# Altium PCB Electrode_Board_v3.1.PcbDoc
Units mm, origin at the board's own origin, x right, y up, seen from the top; angles counter-clockwise.
Board outline 12.97 x 31.97 mm, 2 copper layers (Top Layer, Bottom Layer), stack 0.864 mm thick; 2 components, 3 nets, 8 pads, 18 vias.
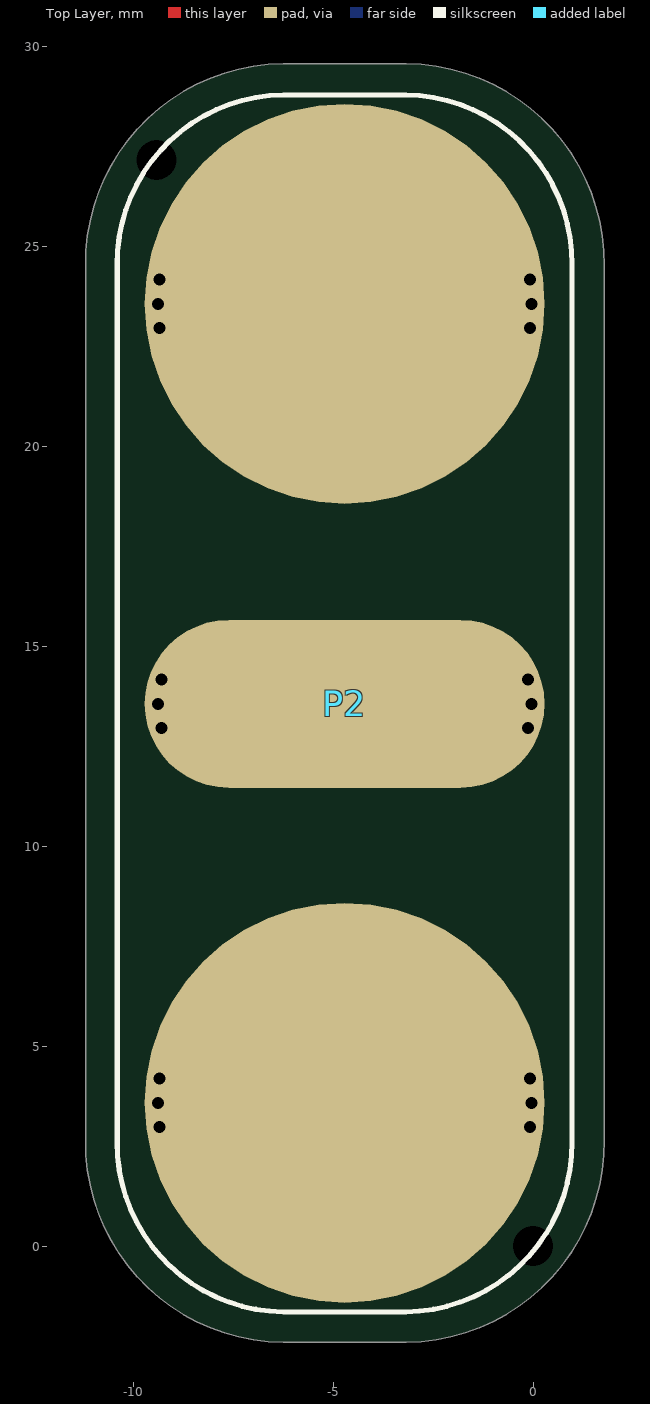
[diagram p0: Top Layer view]
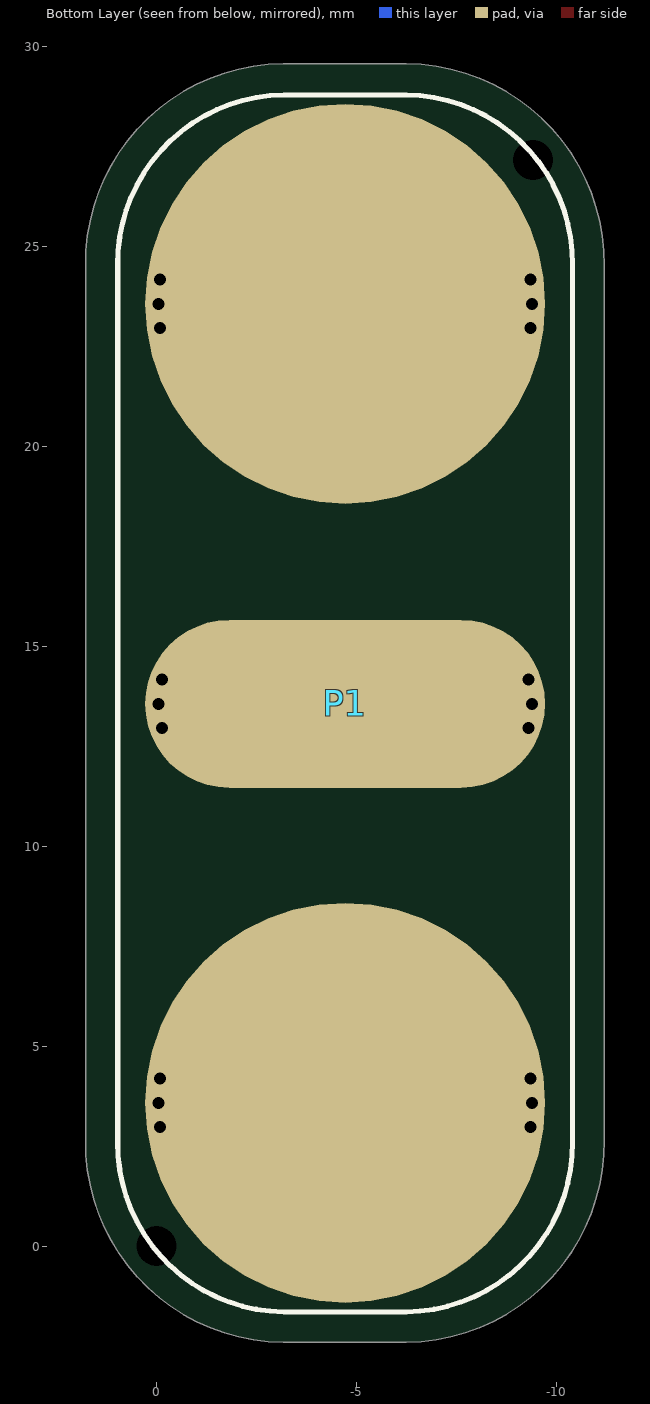
[diagram p1: Bottom Layer view, seen from below]

## Layer stack, top to bottom
Top Solder: solder mask 0.0762, Solder Resist, Dk 3.5
Top Layer: signal copper 0.2286
Dielectric 1: dielectric 0.4064, FR-4, Dk 4.8
Bottom Layer: signal copper 0.2286
Bottom Solder: solder mask 0.0762, Solder Resist, Dk 3.5

## Board outline
-11.188,2.648 ccw(c-6.189,2.592) -6.245,-2.407 -3.166,-2.407 ccw(c-3.222,2.592) 1.778,2.648 1.778,24.511 ccw(c-3.222,24.567) -3.166,29.567 -6.245,29.567 ccw(c-6.189,24.567) -11.188,24.511

## Design rules (kind name [scope] priority, off if disabled: settings)
Clearance [All] p1: gap=0.152 ignorepadtopadclearanceinfootprint=FALSE except(0.102: Arc-SMDPad Track-SMDPad SMDPad-SMDPad)
HoleSize [All] p1: absolutevalues=TRUE maxlimit=25.4 minlimit=0.025 maxpercent=80.000 minpercent=20.000
HoleToHoleClearance [All] p1: gap=0 allowstackedmicrovias=TRUE
MinimumSolderMaskSliver [All] p1: minsoldermaskwidth=0
PolygonConnect [All] p1: connectstyle=Relief reliefconductorwidth=0.254 reliefentries=4 polygonreliefangle="90 Angle" airgapwidth=0.254
RoutingVias [All] p1: holewidth=0.3 width=0.6 viastyle="Through Hole" minholewidth=0.3 minwidth=0.6 maxholewidth=0.8 maxwidth=1.6
SilkToSilkClearance [All] p1: silktosilkclearance=0
SilkToSolderMaskClearance [IsPad] p1: minsilkscreentomaskgap=0 clearancetoexposedcopper=TRUE
SolderMaskExpansion [All] p1: expansion=0.102 istentingtop=FALSE
Width [All] p1: maxlimit=1.016 minlimit=0.254 preferedwidth=0.559
25 further rules are at their usual default settings.

## Components (designator, comment, footprint, x,y, rotation, side; value= is the part's Value field where it differs from the comment)
P1 "DNP" sEMG-sensor -4.711,13.57 r180 bottom
P2 "DNP" SEMG-SENSOR -4.711,13.57 r0 top

## Footprints (in the part's own frame and the unit in brackets; to place one, negate y for a bottom-side part, rotate by r counter-clockwise, add the part's x,y. Pads: shape width x height; smd on the part's side, far side on the other; paste and mask are expansions set on the pad)
sEMG-sensor [mm]
  round 10 smd: 1(0,9.987) 2(0,-9.987)
  oval 10x4.2 smd: 3(0,-0.013)
  silkscreen extent -5.68,-15.21 5.68,15.21
SEMG-SENSOR [mm]
  round 10 smd: 1(0,9.987) 2(0,-9.987)
  oval 10x4.2 smd: 3(0,-0.013)
  silkscreen extent -5.68,-15.21 5.68,15.21

## Part data
P1 P2: library part "SEMG Sensor", "Sensor Connecting Pads"

## Free pads (board coordinates)
  round 0 hole 1 unplated: MH1(-9.41,27.159) MH2(0,0)

## Via types
v1: diameter 0.6, hole 0.3, Top Layer to Bottom Layer, tented both sides, 18 vias

## Nets (pads, with @x,y where several pads share a name; then routed paths per layer and width w, separated by ;. In a path a pad name is that pad's centre, name@x,y a point inside that pad or via, vN(x,y) a via of type N, cw(c..) or ccw(c..) an arc to the next point about the centre after c; other vN are vias at no path point)
NetP1_1: P1.1 P2.1
  other v1: -9.344,22.952 -0.078,22.952 -9.38,23.558 -0.042,23.558 -9.343,24.163 -0.08,24.163
NetP1_2: P1.2 P2.2
  other v1: -9.344,2.978 -0.078,2.978 -9.38,3.583 -0.042,3.583 -9.343,4.189 -0.08,4.189
NetP1_3: P1.3 P2.3
  other v1: -9.292,12.952 -0.129,12.952 -9.38,13.558 -0.042,13.558 -9.291,14.163 -0.131,14.163

## Silkscreen, mask and mechanical layers (free items; w line width, h text height)
Board Outline:
  lines w0.127: -6.921,-2.354 -6.915,-2.348
  lines w0.254: -11.188,2.648 ccw(c-6.189,2.592) -6.245,-2.407 -3.166,-2.407 ccw(c-3.222,2.592) 1.778,2.648 1.778,24.511 ccw(c-3.222,24.567) -3.166,29.567 -6.245,29.567 ccw(c-6.189,24.567) -11.188,24.511 -11.188,2.648
Fabrication:
  drawing of 191 lines, arcs and shapes, not listed
  text "Layer" at -47.864,68.224 h1.52
  text "Name" at -37.453,68.224 h1.52
  text "Material" at -13.837,68.224 h1.52
  text "Thickness" at 8.001,68.224 h1.52
  text "Constant" at 24.507,68.224 h1.52
  text "Board Layer Stack" at 38.981,68.224 h1.52
  text "Top Overlay" at -37.453,65.176 h1.52
  text "Top Solder" at -37.453,62.128 h1.52
  text "Solder Resist" at -13.837,62.128 h1.52
  text "0.076mm" at 8.001,62.128 h1.52
  text "3.5" at 24.507,62.128 h1.52
  text "1" at -47.864,59.08 h1.52
  text "Top Layer" at -37.453,59.08 h1.52
  text "0.229mm" at 8.001,59.08 h1.52
  text "Dielectric 1" at -37.453,56.032 h1.52
  text "FR-4" at -13.837,56.032 h1.52
  text "0.406mm" at 8.001,56.032 h1.52
  text "4.8" at 24.507,56.032 h1.52
  text "2" at -47.864,52.984 h1.52
  text "Bottom Layer" at -37.453,52.984 h1.52
  text "0.229mm" at 8.001,52.984 h1.52
  text "Bottom Solder" at -37.453,49.936 h1.52
  text "Solder Resist" at -13.837,49.936 h1.52
  text "0.076mm" at 8.001,49.936 h1.52
  text "3.5" at 24.507,49.936 h1.52
  text "Bottom Overlay" at -37.453,46.888 h1.52
  text "Total board thickness:" at -47.864,43.84 h1.52
  text "1.016mm" at 8.001,43.84 h1.52
Drill Drawing:
  lines w0.254: -89.985,76.848 -88.291,76.848 -88.291,78.541 -89.985,78.541 -89.985,76.848 ; -89.985,81.081 -89.561,81.081 -89.138,80.658 -88.715,81.081 -88.291,81.081 -88.715,81.504 -88.291,81.928 -88.715,81.928 -89.138,82.351 -89.561,81.928 -89.985,81.928 -89.561,81.504 -89.985,81.081
  lines w0.381: -91.504,75.705 233.475,75.705 ; -91.504,83.325 233.475,83.325 ; -77.511,71.895 -77.511,87.135 ; -63.799,71.895 -63.799,87.135 ; -36.121,71.895 -36.121,87.135 ; -23.272,71.895 -23.272,87.135 ; -4.633,71.895 -4.633,87.135 ; 33.456,71.895 33.456,87.135 ; 48.438,71.895 48.438,87.135 ; 67.381,71.895 67.381,87.135 ; 86.426,71.895 86.426,87.135 ; 108.111,71.895 108.111,87.135 ; 141.985,71.895 141.985,87.135 ; 175.859,71.895 175.859,87.135 ; 197.849,71.895 197.849,87.135 ; -91.504,71.895 233.475,71.895 233.475,87.135 -91.504,87.135 -91.504,71.895
  text "Symbol" at -89.218,84.468 h1.83
  text "Count" at -76.368,84.468 h1.83
  text "Hole Size" at -62.656,84.468 h1.83
  text "Plated" at -34.978,84.468 h1.83
  text "Hole Type" at -22.129,84.468 h1.83
  text "Drill Layer Pair" at -3.49,84.468 h1.83
  text "Via/Pad" at 34.599,84.468 h1.83
  text "Pad Shape" at 49.581,84.468 h1.83
  text "Template" at 68.524,84.468 h1.83
  text "Description" at 87.569,84.468 h1.83
  text "Hole Tolerance (+)" at 109.254,84.468 h1.83
  text "Hole Tolerance (-)" at 143.128,84.468 h1.83
  text "Hole Length" at 177.002,84.468 h1.83
  text "Routed Path Length" at 198.992,84.468 h1.83
  text "2" at -76.368,80.658 h1.52
  text "39.37mil (1.000mm)" at -62.656,80.658 h1.52
  text "NPTH" at -34.978,80.658 h1.52
  text "Round" at -22.129,80.658 h1.52
  text "Top Layer - Bottom Layer" at -3.49,80.658 h1.52
  text "Pad" at 34.599,80.658 h1.52
  text "Rounded" at 49.581,80.658 h1.52
  text "c0hn100" at 68.524,80.658 h1.52
  text "-" at 177.002,80.658 h1.52
  text "-" at 198.992,80.658 h1.52
  text "18" at -76.368,76.848 h1.52
  text "11.81mil (0.300mm)" at -62.656,76.848 h1.52
  text "PTH" at -34.978,76.848 h1.52
  text "Round" at -22.129,76.848 h1.52
  text "Top Layer - Bottom Layer" at -3.49,76.848 h1.52
  text "Via" at 34.599,76.848 h1.52
  text "Rounded" at 49.581,76.848 h1.52
  text "v60h30m0mx0" at 68.524,76.848 h1.52
  text "-" at 177.002,76.848 h1.52
  text "-" at 198.992,76.848 h1.52
  text "20 Total" at -76.368,73.038 h1.52

## Dimensions
1.778,24.511 to -11.188,24.511 on Dimension
-3.166,-2.407 to -6.245,29.567 on Dimension
-6.189,2.592 to -11.887,-2.616 on Dimension